# Altium PCB AmbientPro_Main_Board_V1.0.PcbDoc (part 5 of 5)
Units mm, origin at the board's own origin, x right, y up, seen from the top; angles counter-clockwise.
Board outline 100 x 100 mm, 4 copper layers (Top Layer, GND, PWR, Bottom Layer), stack 1.566 mm thick; 176 components, 124 nets, 570 pads, 283 vias.
Unrouted connection lines stored in the file: 133.
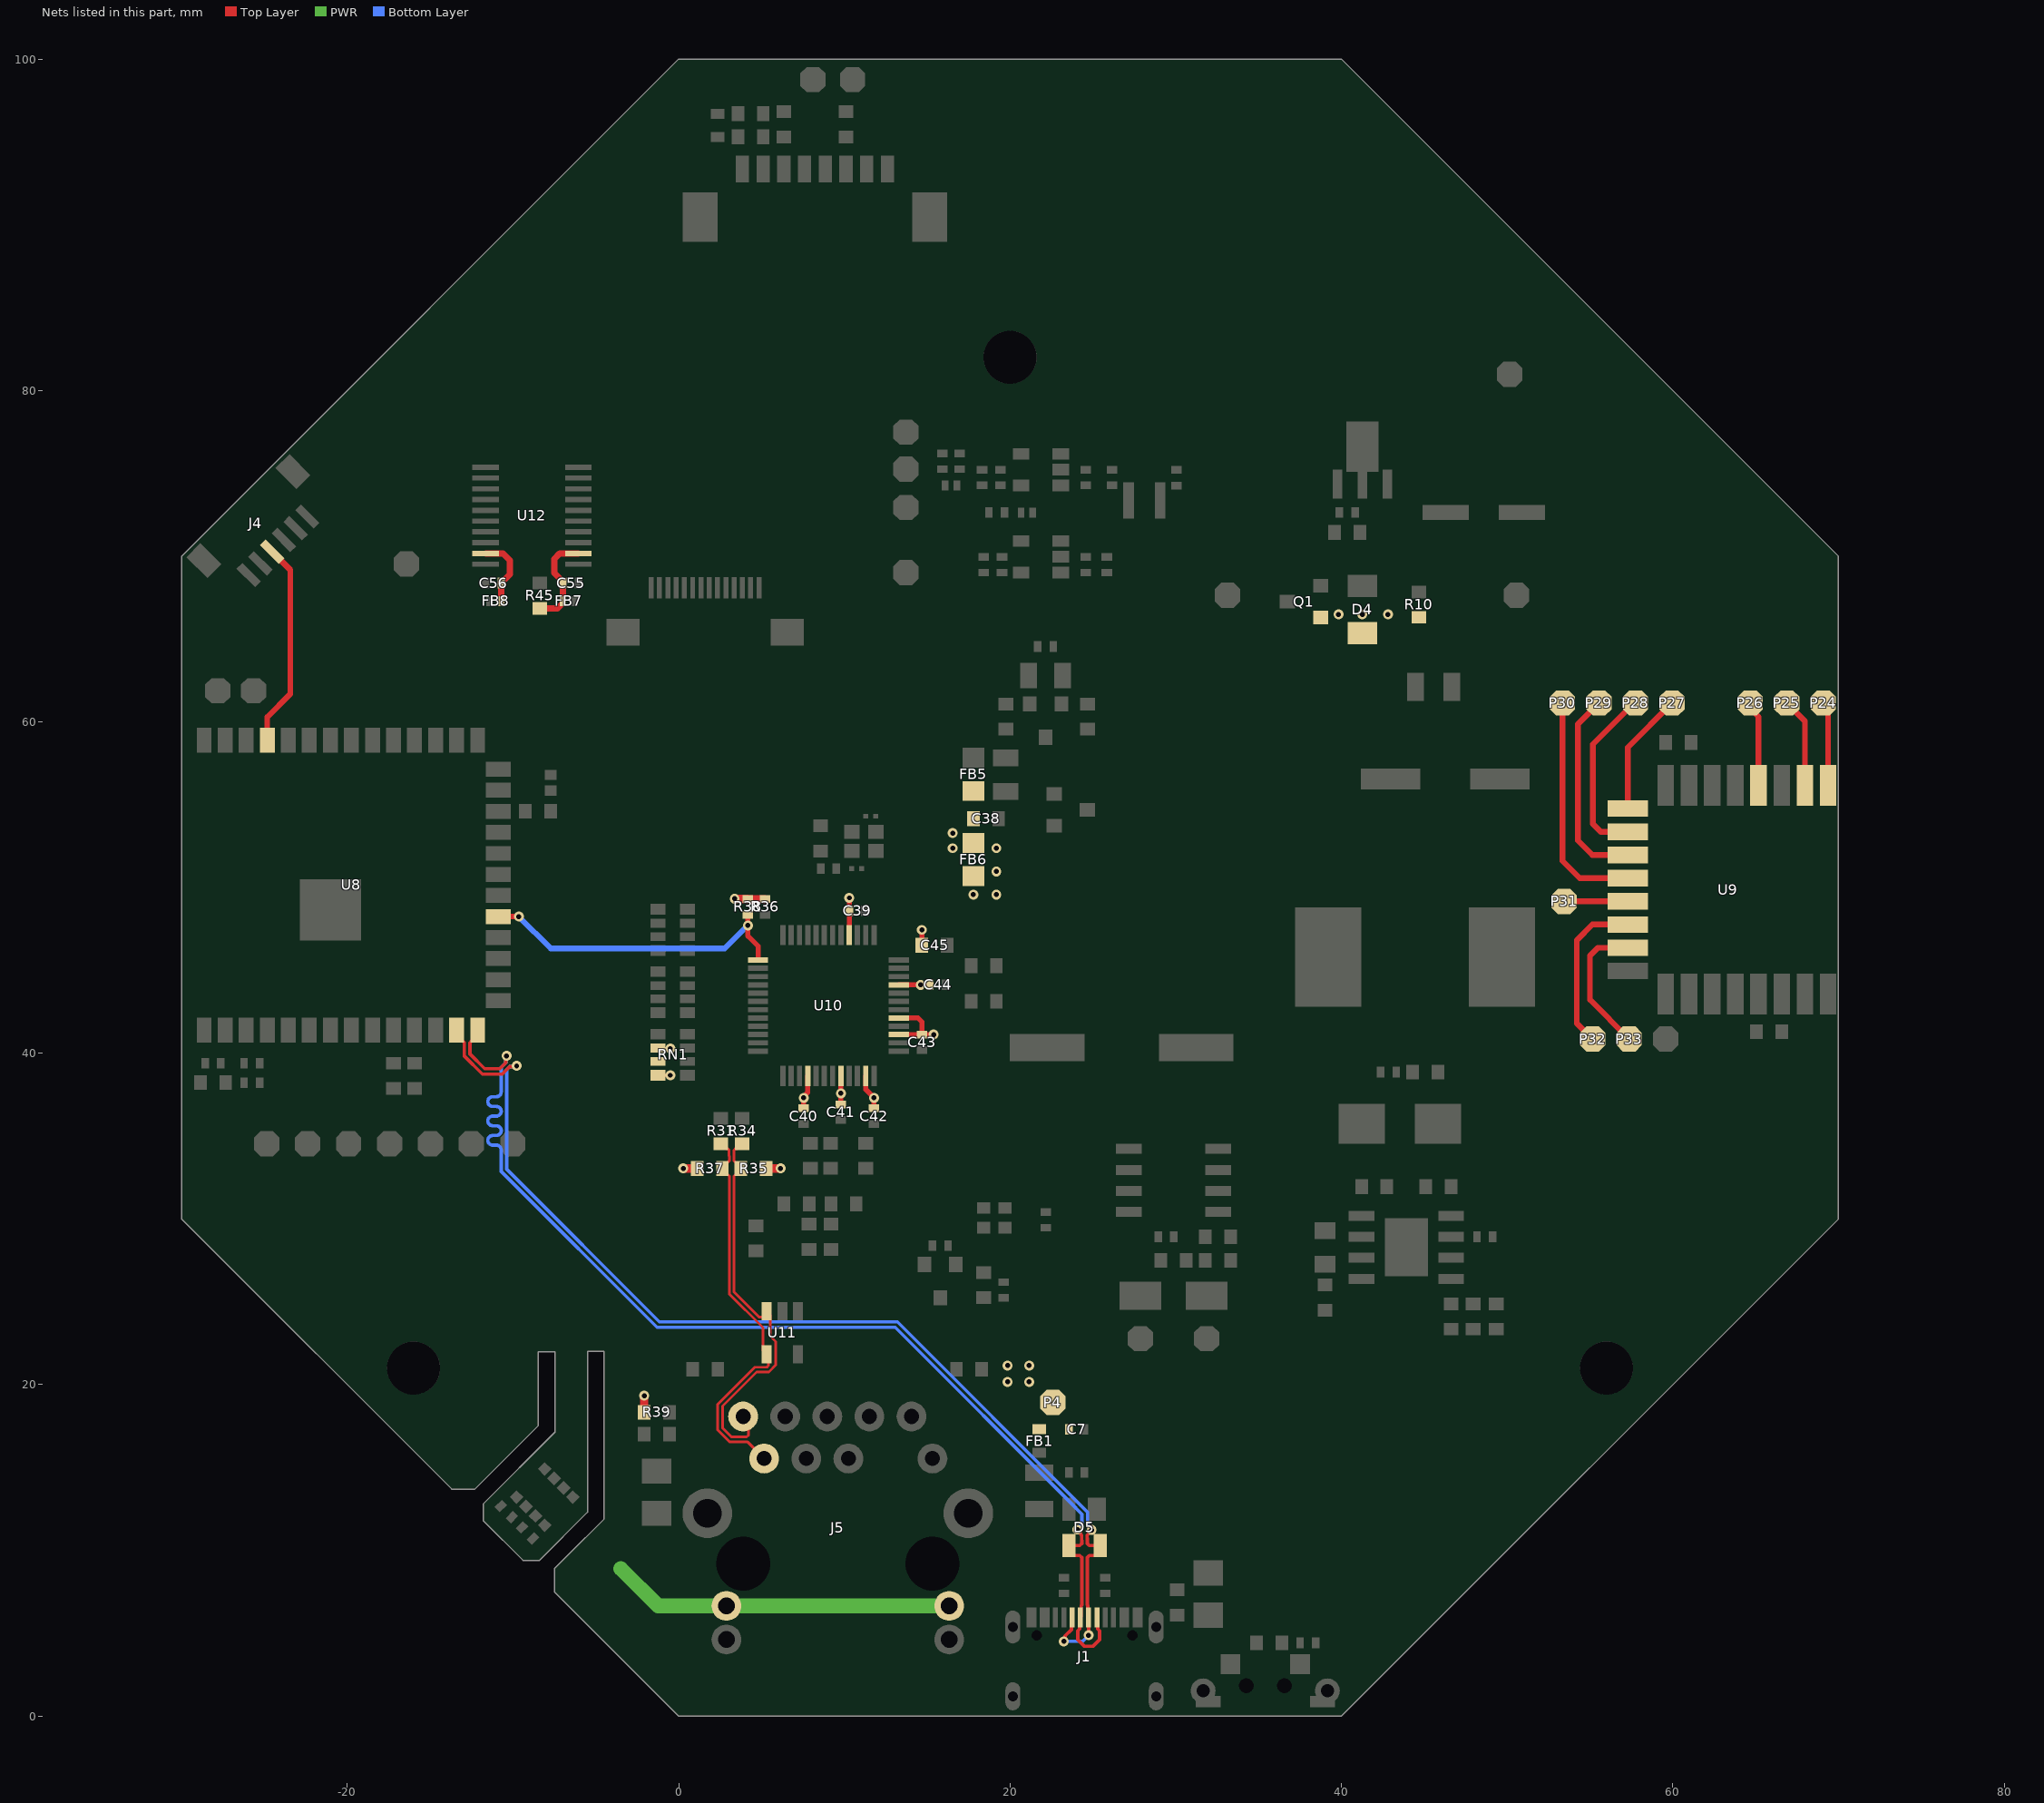
[diagram p5: the nets of this part, all layers, seen from the top]

## Via types
v1: diameter 0.6, hole 0.3, Top Layer to Bottom Layer, 283 vias

## Nets (pads, with @x,y where several pads share a name; then routed paths per layer and width w, separated by ;. In a path a pad name is that pad's centre, name@x,y a point inside that pad or via, vN(x,y) a via of type N, cw(c..) or ccw(c..) an arc to the next point about the centre after c; other vN are vias at no path point) (continued)
TD_N: J5.2 R31.1 R37.1 U11.4 | length 24.1
  Top Layer w0.16: R31.1@2.544,34.547 2.845,34.246 2.951,34.246 3.045,34.152 3.045,33.806 3.054,33.797 3.054,33.506 2.961,33.412 2.94,33.412 2.639,33.111 R37.1@2.639,33.048 2.639,32.984 2.94,32.683 2.961,32.683 3.054,32.59 3.054,25.479 5.084,23.449 5.084,22.064 5.416,21.732 5.416,21.148 5.322,21.054 4.589,21.054 2.361,18.826 2.361,17.261 3.063,16.559 4.141,16.559 J5.2@5.16,15.54
TD_P: J5.1 R34.1 R35.1 U11.3 | length 24.6
  Top Layer w0.16: R34.1@3.833,34.547 3.532,34.246 3.426,34.246 3.332,34.152 3.332,33.925 3.341,33.916 3.341,33.506 3.435,33.412 3.456,33.412 3.757,33.111 R35.1@3.757,33.048 3.757,32.984 3.456,32.683 3.435,32.683 3.341,32.59 3.341,25.597 4.857,24.082 5.084,24.082 5.304,24.302 U11.3@5.304,24.444 5.523,24.224 5.523,22.934 5.861,22.596 5.861,21.187 5.441,20.767 4.707,20.767 2.648,18.707 2.648,17.38 3.182,16.846 4.11,16.846 4.204,16.94 4.204,17.766 J5.1@3.89,18.08
TXD: J4.3 U8.37 | length 12.4
  Top Layer w0.345: U8.37@-24.834,58.901 -24.834,60.292 -23.441,61.685 -23.441,69.175 J4.3@-24.537,70.271
USB_D_N: D5.4 J1.A7 J1.B7 U8.13 | length 68.2
  Top Layer w0.203: U8.13@-13.404,41.401 -13.404,41.101 -13.055,40.753 -13.053,40.753 -12.934,40.634 -12.934,39.823 -11.846,38.735 -10.657,38.735 -10.201,39.191 -9.831,39.191 v1(-9.779,39.243) ; v1(23.246,4.509) 23.322,4.585 23.322,4.839 23.701,5.218 23.701,5.902 J1.B7@23.746,5.947 ; 24.661,8.231 24.661,6.713 24.698,6.677 24.698,5.996 J1.A7@24.746,5.947 v1(24.746,4.877) ; 24.662,8.231 24.662,9.573 24.781,9.692 25.148,9.692 25.447,9.99 D5.4@25.447,10.29 24.781,10.29 24.662,10.409 24.662,10.715 24.655,10.722 24.655,10.908 24.725,10.979 24.725,11.1 24.862,11.236 v1(24.924,11.236)
  Bottom Layer w0.203: v1(-9.779,39.243) -9.831,39.191 -10.201,39.191 -10.384,39.009 -10.384,34.061 -10.384,33.009 -1.167,23.792 13.2,23.792 24.672,12.32 24.672,11.575 24.924,11.323 v1(24.924,11.236) ; v1(23.246,4.509) 23.255,4.518 24.386,4.518 v1(24.746,4.877)
USB_D_P: D5.3 J1.A6 J1.B6 U8.14 | length 71
  Top Layer w0.203: U8.14@-12.134,41.401 -12.134,41.101 -12.482,40.753 -12.485,40.753 -12.604,40.634 -12.604,39.959 -11.709,39.065 -10.794,39.065 -10.435,39.425 -10.435,39.795 v1(-10.383,39.847) ; v1(24.07,11.25) 24.118,11.25 24.268,11.1 24.268,10.965 24.325,10.908 24.325,10.585 24.332,10.578 24.332,10.409 24.213,10.29 D5.3@23.547,10.29 23.547,9.99 23.845,9.692 24.213,9.692 24.332,9.573 24.332,8.368 ; 24.331,8.367 24.331,6.713 24.294,6.677 24.294,5.996 J1.A6@24.246,5.947 24.198,5.899 24.198,5.256 24.175,5.234 24.175,5.232 24.09,5.147 24.09,4.606 24.474,4.222 25.017,4.222 25.402,4.606 25.402,5.147 25.317,5.232 25.317,5.234 25.294,5.256 25.294,5.899 J1.B6@25.246,5.947
  Bottom Layer w0.203: v1(-10.383,39.847) -10.435,39.795 -10.435,39.425 -10.714,39.145 -10.714,38.513 -10.714,37.668 cw(c-11.006,37.668) -11.006,37.376 -11.227,37.376 ccw(c-11.227,37.084) -11.227,36.792 -11.006,36.792 cw(c-11.006,36.5) -11.006,36.208 -11.227,36.208 ccw(c-11.227,35.916) -11.227,35.624 -11.006,35.624 cw(c-11.006,35.331) -11.006,35.039 -11.227,35.039 ccw(c-11.227,34.747) -11.227,34.455 -11.006,34.455 cw(c-11.006,34.163) -10.714,34.163 -10.714,34.061 -10.714,32.872 -1.304,23.462 13.064,23.462 23.647,12.878 24.342,12.183 24.342,11.582 24.07,11.31 v1(24.07,11.25)
UWB_EXT: P24.1 U9.1 | length 5.1
  Top Layer w0.345: P24.1@69.088,61.138 69.377,60.848 U9.1@69.377,56.162
UWB_IO0: P33.1 U9.15 | length 8.5
  Top Layer w0.345: U9.15@57.282,46.367 55.47,46.367 55.004,45.902 55.004,43.224 P33.1@57.372,40.856
UWB_IO1: P32.1 U9.14 | length 9.8
  Top Layer w0.345: P32.1@55.167,40.856 54.209,41.814 54.209,46.818 55.158,47.767 U9.14@57.282,47.767
UWB_IO2: P31.1 U9.13 | length 3.8
  Top Layer w0.345: P31.1@53.447,49.167 U9.13@57.282,49.167
UWB_IO3: P30.1 U9.12 | length 13.9
  Top Layer w0.345: P30.1@53.343,61.138 53.343,51.617 54.393,50.567 U9.12@57.282,50.567
UWB_IO4: P29.1 U9.11 | length 12.2
  Top Layer w0.345: P29.1@55.548,61.138 54.273,59.863 54.273,52.836 55.142,51.967 U9.11@57.282,51.967
UWB_IO5: P28.1 U9.10 | length 10.7
  Top Layer w0.345: U9.10@57.282,53.367 55.659,53.367 55.184,53.842 55.184,58.651 57.671,61.138 P28.1@57.753,61.138
UWB_IO6: P27.1 U9.9 | length 7.5
  Top Layer w0.345: U9.9@57.282,54.767 57.282,58.462 P27.1@59.958,61.138
UWB_IO7: P26.1 U9.4 | length 5.2
  Top Layer w0.345: P26.1@64.677,61.138 64.953,60.862 64.953,60.529 65.177,60.305 U9.4@65.177,56.162
UWB_WAKE: P25.1 U9.2 | length 5.4
  Top Layer w0.345: P25.1@66.883,61.138 67.977,60.043 U9.2@67.977,56.162
VBUS: C7.2 D4.2 FB1.2 P4.1 Q1.1 R10.2
  other v1: 19.858,20.168 21.153,20.168 19.858,21.159 21.153,21.159 39.832,66.488 41.267,66.488 42.811,66.488
VCCA: C55.2 FB7.2 R45.2 U12.2 | length 6
  Top Layer w0.381: R45.2@-8.387,66.853 -7.322,66.853 -6.99,67.185 FB7.2@-6.99,67.285 C55.2@-6.99,68.377 -6.99,68.466 -7.517,68.993 -7.517,69.836 -7.19,70.164 U12.2@-6.05,70.164
VCCB: C56.2 FB8.2 U12.19 | length 4.3
  Top Layer w0.381: U12.19@-11.65,70.164 -10.599,70.164 -10.183,69.747 -10.183,68.904 C56.2@-10.71,68.377 FB8.2@-10.71,67.285
VDD: C38.2 C39.2 FB5.2 FB6.1 J5.11 J5.13 R36.1 R38.1 RN1.6 RN1.7 RN1.8 U10.28 | length 39.8
  Top Layer w0.16: RN1.8@-1.239,38.672 v1(-0.508,38.672) ; RN1.6@-1.239,40.312 -1.215,40.288 v1(-0.508,40.288)
  Top Layer w0.305: U10.28@10.29,47.128 10.296,47.134 10.296,48.582 C39.2@10.302,48.589 v1(10.302,49.378)
  Top Layer w0.508: v1(3.378,49.327) 3.392,49.313 4.166,49.313 R38.1@4.18,49.3 R36.1@5.204,49.3
  PWR w0.889: -3.489,8.9 -1.239,6.65 J5.11@2.88,6.65 J5.13@16.33,6.65
  Bottom Layer w0.762: J5.11@2.88,6.65 J5.13@16.33,6.65
  other v1: 16.535,52.375 19.174,52.375 16.535,53.289
VDDA: C40.2 C41.2 C42.2 C43.2 C44.2 C45.2 FB6.2 R35.2 R37.2 R39.2 U10.4 U10.8 U10.11 U10.15 U10.17 U10.21 | length 15.9
  Top Layer w0.305: C40.2@7.541,36.678 v1(7.541,37.315) 7.541,37.395 7.79,37.644 U10.4@7.79,38.628 ; C41.2@9.79,36.906 v1(9.79,37.58) U10.8@9.79,38.628 ; U10.11@11.29,38.628 11.29,37.815 v1(11.79,37.315) ; C42.2@11.79,36.678 v1(11.79,37.315) ; v1@11.79,37.391 v1(11.79,37.315) ; U10.15@13.29,41.128 C43.2@14.679,41.128 ; U10.17@13.29,42.128 14.45,42.128 14.679,41.899 C43.2@14.679,41.128 ; U10.21@13.29,44.128 v1(14.602,44.128) C44.2@15.161,44.128 ; C45.2@14.679,46.518 v1(14.679,47.447) ; v1(15.39,41.128) C43.2@14.679,41.128
  Top Layer w0.508: R39.2@-2.083,18.334 v1(-2.083,19.329) ; v1(0.279,33.048) R37.2@1.115,33.048 ; R35.2@5.281,33.048 v1(6.151,33.048)
  other v1: 17.789,49.581 19.174,49.581 19.174,50.966
W5500_RST: R38.2 U8.19 U10.37 | length 19.4
  Top Layer w0.305: R38.2@4.18,48.36 v1(4.18,47.719) 4.18,47.077 4.79,46.467 U10.37@4.79,45.649
  Top Layer w0.345: U8.19@-10.884,48.251 v1(-9.652,48.251)
  Bottom Layer w0.345: v1(-9.652,48.251) -7.72,46.32 2.781,46.32 v1(4.18,47.719)
pads on no net: J1.A8 J1.B8 J1.MH J2.MP1 J2.MP2 J3.7 J3.8 J3.S1 J3.S2 J4.MP1 J4.MP2 J5.MH LED1.2 RN1.4 RN1.5 RN2.1 RN2.2 RN2.7 RN2.8 SW1.3 SW1.4 SW1.5 SW1.6 SW1.MH0 SW1.MH1 U2.7 U4.4 U5.4 U8.15 U8.16 U8.26 U8.28 U8.29 U8.30 U10.7 U10.12 U10.13 U10.18 U10.24 U10.26 U10.46 U10.47

## Polygon pours and split planes (outlines as drawn)
+3V3 on PWR "+3V3_L03_P017" (solid, pour order 17): 35.789,26.248 35.789,15.977 33.731,13.919 19.38,13.919 19.38,0.479 39.747,0.479 63.017,23.749 38.288,23.749
VDD on PWR "VDD_L03_P000" (solid, pour order 0): 3.89,14.64 0.492,14.64 -0.102,14.046 -0.102,11.207 0.365,10.74 0.365,0.356 -7.087,7.807 -7.087,8.71 -3.937,11.859 -3.937,50.546 0.838,55.321 20.117,55.321 20.625,54.813 20.625,52.197 20.193,51.765 12.992,51.765 12.319,51.092 12.319,48.641 11.176,47.498 5.486,47.498 4.724,46.736 4.724,35.725 4.001,35.001 -0.864,35.001 -1.397,34.468 -1.397,32.69 -0.832,32.125 7.423,32.125 8.103,31.445 8.103,22.403 7.391,21.692 -2.083,21.692 -2.845,20.93 -2.845,18.694 -2.159,18.009 2.261,18.009 3.89,16.379
+3V3 on PWR "+3V3_L03_P013" (solid, pour order 13): 13.945,37.719 13.945,20.533 14.686,19.792 16.662,19.792 16.662,36.796 23.377,43.51 33.045,43.51 34.493,44.958 34.493,67.361 35.433,68.301 42.621,68.301 43.51,67.412 43.51,35.89 42.926,35.306 42.926,34.646 43.358,34.214 59.665,34.214 61.849,36.398 61.849,58.318 62.586,58.318 62.586,59.309 61.9,59.309 61.9,65.938 50.952,76.886 33.68,76.886 31.318,79.248 31.318,93.294 29.489,95.123 4.775,95.123 3.734,94.082 -1.295,94.082 -2.057,94.844 -2.057,97.333 -29.566,69.825 -29.566,30.277 -13.564,14.275 -12.421,14.275 -8.992,17.704 -8.992,22.53 -4.648,22.53 -4.648,50.521 0.584,55.753 20.295,55.753 21.006,55.042 21.006,44.78
VDDA on PWR "VDDA_L03_P011" (solid, pour order 11): 13.513,38.049 13.513,20.524 12.778,19.792 3.691,19.792 2.264,18.364 -2.057,18.364 -2.489,18.796 -2.489,20.828 -2.007,21.311 7.717,21.311 8.56,22.153 8.56,31.674 7.849,32.385 -0.711,32.385 -1.118,32.791 -1.118,34.341 -0.711,34.747 4.166,34.747 5.004,35.585 5.004,46.64 5.563,47.199 11.487,47.199 12.649,48.362 12.649,50.927 13.208,51.486 20.193,51.486 20.625,51.054 20.625,45.161
VBUS on PWR "VBUS_L03_P010" (solid, pour order 10): 23.825,43.18 17.043,36.398 17.043,19.787 21.58,19.787 23.063,21.27 23.063,26.321 22.76,26.625 21.305,26.625 19.964,27.965 19.964,33.985 21.158,35.179 42.189,35.179 43.205,36.195 43.205,67.335 42.52,68.021 35.535,68.021 34.849,67.335 34.849,44.729 33.299,43.18
+5V on PWR "+5V_L03_P009" (solid, pour order 9): 62.154,58.039 62.89,58.039 62.89,59.639 62.154,59.639 62.154,66.177 51.165,77.165 33.858,77.165 31.674,79.35 31.674,93.396 29.642,95.428 4.623,95.428 3.607,94.412 -1.143,94.412 -1.753,95.021 -1.753,97.638 0.178,99.568 39.726,99.568 69.494,69.799 69.494,30.201 63.424,24.13 38.71,24.13 35.687,27.153 21.351,27.153 20.269,28.234 20.269,33.706 21.412,34.849 42.193,34.849 43.181,33.86 59.87,33.86 62.154,36.144
LAN_PWR_N on PWR "LAN_PWR_N_L03_P007" (solid, pour order 7): 29.362,17.628 28.346,16.612 18.51,16.612 18.186,16.288 18.186,14.792 18.602,14.376 33.528,14.376 35.347,16.195 35.347,26.248 34.97,26.625 29.698,26.625 29.362,26.289
LAN_PWR_P on PWR "LAN_PWR_P_L03_P001" (solid, pour order 1): 23.425,21.216 21.742,19.533 18.492,19.533 18.186,19.227 18.186,17.348 18.491,17.043 28.016,17.043 28.88,17.907 28.88,26.279 28.534,26.625 23.729,26.625 23.425,26.321
+5V on Top Layer "+5V_L01_P005" (solid, pour order 5): 41.962,73.292 42.537,72.717 42.537,70.657 43.66,69.534 43.66,67.532 38.286,67.532 38.286,69.741 39.621,69.741 40.498,70.619 40.498,74.899 40.301,75.097 40.301,75.664 33.5,75.664 33.5,86.988 48.791,86.988 48.791,75.664 42.234,75.664 42.234,75.097 41.962,74.825
+3V3 on Top Layer "+3V3_L01_P006" (solid, pour order 6): 42.477,75.212 42.477,73.482 42.884,73.076 42.884,71.068 43.464,70.488 48.816,70.488 48.816,75.212
+5V on Top Layer "+5V_L01_P014" (solid, pour order 14): 28.733,74.483 28.733,72.248 35.735,72.248 35.735,86.988 33.5,86.988 33.5,75.482 33.5,74.483
NetC4_2 on Top Layer "NETC4_2_L01_P018" (solid, pour order 18): 51.692,62.953 46.076,62.953 46.076,50.216 46.076,42.796 51.692,42.796
GND on Top Layer "GND_L01_P016" (solid, remove dead copper, pour order 16): 69.453,32.36 54.634,32.36 54.634,15.366 39.815,0.546 0.089,0.546 -6.96,7.595 -6.96,8.661 -3.951,11.67 -3.951,22.567 -9.017,22.567 -9.017,17.805 -12.471,14.351 -13.614,14.351 -29.454,30.19 -29.454,69.81 0.19,99.453 39.815,99.453 54.938,84.331 54.938,67.386 69.453,67.386
+3V3 on Top Layer "+3V3_L01_P002" (solid, pour order 2): 52.629,23.749 52.629,37.42 53.233,38.024 54.085,38.024 54.634,37.475 54.634,22.518 38.849,6.732 38.557,6.732 36.125,6.74 35.42,6.036 35.42,4.893 35.42,3.975 34.499,3.975 34.499,8.54 37.42,8.54
LAN_PWR_P on Top Layer "LAN_PWR_P_L01_P004" (solid, pour order 4): 35.509,27.457 37.325,25.642 39.649,25.642 39.649,28.055 38.383,28.055 38.379,28.059 37.88,28.059 37.186,28.753 37.186,36.043 35.331,37.897 28.042,37.897 27.483,38.456 27.483,40.703 27.026,41.16 19.991,41.16 19.991,36.398 34.214,36.398 35.509,35.103
NetD5_2 on Top Layer "NETD5_2_L01_P003" (solid, pour order 3): 28.503,7.696 27.354,7.696 27.196,7.538 27.196,5.347 27.696,4.847 27.696,2.571 27.173,2.047 21.905,2.047 21.412,2.54 21.412,4.964 21.796,5.347 21.796,7.322 21.422,7.696 20.422,7.696 20.422,13.19 23.947,13.19 23.947,11.8 23.156,11.8 22.396,11.04 22.396,4.223 23.139,3.48 26.205,3.48 26.596,3.871 26.596,9.4 28.503,9.4
GND on Bottom Layer "GND_L04_P012" (solid, remove dead copper, pour order 12): -13.614,14.351 -12.471,14.351 -9.017,17.805 -9.017,22.567 -3.951,22.567 -3.951,11.67 -6.858,8.763 -6.858,7.493 0.089,0.546 39.815,0.546 69.453,30.185 69.453,69.739 39.739,99.453 0.19,99.453 -29.454,69.81 -29.454,30.19
NetR4_1 on Bottom Layer "NETR4_1_L04_P008" (solid, pour order 8): 32.703,31.42 32.703,27.026 36.932,27.026 36.932,23.601 47.142,23.601 47.142,30.074 45.796,31.42
GND on GND "GND_L02_P015" (solid, pour order 15): -13.614,14.351 -12.471,14.351 -9.017,17.805 -9.017,22.567 -3.951,22.567 -3.951,11.67 -6.858,8.763 -6.858,7.493 0.089,0.546 39.815,0.546 69.453,30.185 69.453,69.739 39.739,99.453 0.19,99.453 -29.454,69.81 -29.454,30.19

## Other copper
Top Layer:
  rectangle net +5V: 38.286,67.532 43.66,68.872
  rectangle net GND: 49.197,70.148 54.938,75.212
  rectangle net VBUS: 38.286,64.229 45.12,66.842
  rectangle net +5VP: 34.465,59.962 37.508,68.872
  rectangle net +3V3: -3.355,68.015 -1.505,68.742
  rectangle net +3V3: -1.87,67.442 -1.505,68.742
  rectangle net +5VP: 33.02,59.969 44.968,62.953
  rectangle net NetC1_1: 37.821,30.496 41.984,33.376
  rectangle net NetC1_1: 37.192,42.796 42.622,48.796
  rectangle net NetC1_1: 40.157,29.896 41.997,38.182
  rectangle net NetC1_1: 37.821,32.885 42.622,48.796
  rectangle net NetR4_1: 38.379,28.414 45.228,29.456
  rectangle net NetR4_1: 42.519,26.086 45.339,30.496
  rectangle net LAN_PWR_P: 38.379,26.59 39.649,27.779
  rectangle net LAN_PWR_P: 38.379,25.642 39.649,28.055
  rectangle net LAN_PWR_P: 38.379,27.246 42.088,28.059
  rectangle net NetR4_1: 38.379,28.523 39.649,29.815
  rectangle net NetC19_2: 21.488,73.635 27.483,74.62
  rectangle net VDD: -1.689,38.347 -0.305,40.577
  rectangle net GND: 67.477,42.347 69.877,44.797
  rectangle net VDD: 16.154,51.943 18.44,53.823
  rectangle net VDD: 16.154,51.943 19.812,53.238
  rectangle net VDDA: 16.154,49.022 19.812,51.296
  rectangle net VBUS: 19.202,16.986 22.005,21.768
  rectangle net NetC37_2: 17.129,57.227 22.555,59.935
  rectangle net +3V3: 19.3,60.618 21.904,64.865
  rectangle net NetC36_1: 22.386,60.618 25.117,64.865
  rectangle net VDD: 17.129,52.096 18.449,56.427
  region net +3V3: -8.022,11.029 -7.598,11.453 -8.649,12.505 -9.074,12.081
  region net +3V3: -9.349,13.219 -9.997,13.868 -10.576,13.29 -9.927,12.641
  region net +3V3: -11.618,12.248 -11.12,11.749 -9.499,13.37 -9.997,13.868
  region net +3V3: -9.697,10.326 -9.211,9.84 -7.598,11.453 -8.084,11.939
  region net GND: -9.05,11.446 -10.002,12.398 -10.862,11.538 -9.91,10.586
  region net GND: -10.394,11.892 -9.969,11.468 -8.791,12.646 -9.215,13.071
  rectangle net NetC24_2: 1.95,92.565 4.25,94.165
  rectangle net GND: 4.7,92.565 5.5,97.145
  rectangle net +5V: 1.95,96.116 3.957,97.289
  rectangle net NetC24_2: 1.95,92.565 3.957,95.86
  region net 1V8_SENSOR: 21.163,69.362 18.081,69.362 18.081,68.662 21.163,68.662
  rectangle net NetC13_2: 21.163,72.086 21.796,73.164
  rectangle net NetC13_2: 21.488,68.662 22.225,71.403
  rectangle net NetC13_2: 21.488,70.562 23.563,71.403
  rectangle net NetC13_2: 21.488,68.662 26.162,69.362
  rectangle net 3V3_CLEAN: 19.431,72.314 20.863,74.636
  rectangle net 3V3_SENSOR: 15.608,73.97 16.289,75.476
  rectangle net 3V3_CLEAN: 16.589,73.92 17.285,75.476
  rectangle net 3V3_CLEAN: 16.589,73.92 21.163,74.638
  rectangle net NetC19_2: 21.488,75.82 23.563,76.52
  rectangle net NetC19_2: 21.488,73.779 22.25,76.52
  rectangle net NetC19_2: 25.845,72.255 27.483,74.62
  rectangle net GND: 9.472,35.482 10.107,36.195
  rectangle net GND: 59.077,54.937 60.077,59.195
  rectangle net +3V3: 60.477,54.937 64.277,59.195
  region net LAN_PWR_N: 35.357,26.684 30.249,26.684 30.249,24.054 35.357,24.054
  rectangle net LAN_PWR_P: 23.52,29.368 25.552,41.16
  rectangle net NetR6_2: 32.842,28.473 33.764,30.722
  rectangle net NetR6_2: 31.793,29.939 33.764,30.722
  rectangle net LAN_PWR_N: 30.582,24.517 32.174,29.368
  rectangle net LAN_PWR_N: 30.249,24.486 32.174,27.945
  rectangle net LAN_PWR_P: 27.487,24.517 29.487,27.945
  rectangle net LAN_PWR_P: 23.52,29.368 29.17,30.722
  rectangle net LAN_PWR_P: 27.487,24.517 29.17,30.722
  rectangle net LAN_PWR_P: 23.419,24.054 29.487,26.684
  rectangle net VBUS: 19.202,16.986 23.775,19.688
  rectangle net NetC6_2: 20.422,14.19 22.614,16.204
  rectangle net NetC6_2: 20.422,14.19 23.775,15.19
  rectangle net GND: -1.689,42.123 -0.789,47.31
  rectangle net +3V3: -17.658,37.49 -15.499,38.252
  rectangle net GND: -29.247,37.782 -28.154,38.672
  region net GND: -28.154,42.151 -29.094,42.151 -29.094,37.782 -28.154,37.782
  rectangle net +3V3: -27.863,39.078 -26.002,39.713
  rectangle net +3V3: -27.864,37.782 -26.924,42.151
  rectangle net NetC54_2: -2.21,11.151 2.718,13.335
  rectangle net NetC11_1: 28.503,4.509 30.532,6.48
  rectangle net NetC11_1: 28.503,5.337 32.856,6.547
  pour cut-out: 49.767,41.438 51.859,41.438 51.867,41.446 51.867,42.607 49.767,42.607
  pour cut-out: 42.757,40.243 44.849,40.243 44.857,40.25 44.857,41.411 42.757,41.411
  pour cut-out: 42.342,49.047 44.434,49.047 44.442,49.055 44.442,50.216 42.342,50.216
  pour cut-out: 48.82,75.733 49.071,75.733 49.071,74.981 48.82,74.981
  pour cut-out: 29.487,23.795 30.249,23.795 30.249,24.054 29.487,24.054
  pour cut-out: 30.555,36.168 30.555,35.588 31.246,35.588 31.246,36.168 30.564,36.168
  pour cut-out: 0.365,14.478 18.847,14.478 18.847,0 0.365,0
GND:
  pour cut-out: 35.567,81.99 35.567,77.927 40.582,77.927 40.582,81.99
  pour cut-out: 0.365,14.478 18.847,14.478 18.847,0 0.365,0
  pour cut-out: 41.021,34.419 41.021,30.355 43.942,30.355 43.942,34.419
  pour cut-out: 39.116,43.256 39.116,37.846 43.815,37.846 43.815,43.256
  pour cut-out: 40,75.894 40,71.831 45.015,71.831 45.015,75.894
  pour cut-out: 19.355,21.717 19.355,19.634 21.742,19.634 21.742,21.717
PWR:
  pour cut-out: 39.548,54.585 39.548,55.613 44.348,55.613 44.348,54.585
  pour cut-out: 39.548,57.48 39.548,58.509 44.348,58.509 44.348,57.48
  pour cut-out: 44.854,33.884 48.232,33.884 48.232,37.219 44.85,37.219 44.85,38.222 49.248,38.222 49.248,32.766 44.859,32.766 44.854,32.771 44.854,33.879
  pour cut-out: 42.189,33.884 38.811,33.884 38.811,37.219 42.193,37.219 42.193,38.222 37.795,38.222 37.795,32.766 42.185,32.766 42.189,32.771 42.189,33.879
  pour cut-out: 0.365,14.478 18.847,14.478 18.847,0 0.365,0
  pour cut-out: 42.626,30.018 42.626,26.564 45.217,26.564 45.217,30.018
Bottom Layer:
  rectangle net VBUS: 38.286,64.229 44.676,68.202
  rectangle net +3V3: 42.873,70.122 48.816,75.228
  rectangle net VBUS: 19.431,19.863 21.59,21.59
  region net NetC1_1: 42.621,38.202 37.389,38.202 37.389,32.893 42.621,32.893
  rectangle net NetD5_2: 21.606,6.883 27.386,8.457
  region net NetD5_2: 28.672,9.347 26.487,9.347 26.487,7.722 28.672,7.722
  region net NetD5_2: 27.386,9.347 26.487,9.347 26.487,6.883 27.386,6.883
  rectangle net NetD5_2: 21.606,6.883 22.504,9.347
  rectangle net NetD5_2: 20.32,7.722 22.504,9.347
  pour cut-out: 23.385,24.326 23.385,26.459 25.798,26.459 25.798,24.326
  pour cut-out: 32.893,24.282 32.893,26.416 35.306,26.416 35.306,24.282
  pour cut-out: 15.088,34.9 26.06,45.872 66.015,45.872 67.361,44.526 67.361,39.802 65.684,39.802 65.684,43.18 26.721,43.18 14.97,31.429 14.97,34.784 15.087,34.901
  pour cut-out: 24.912,57.658 60.263,57.658 62.636,55.284 62.636,46.554 62.967,46.223 63.594,46.223 63.678,46.139 63.678,45.212 63.627,45.161 60.366,45.161 59.884,45.644 59.884,53.091 59.307,53.668 24.912,53.668
  pour cut-out: 29.504,61.369 -16.964,61.369 -23.952,54.381 -23.952,52.426 -19.935,52.426 -19.487,52.873 -19.487,53.157 -16.509,56.135 29.504,56.135
  pour cut-out: 38.717,81.025 38.717,76.962 43.732,76.962 43.732,81.025
  pour cut-out: -19.487,53.157 -19.487,43.162 -18.346,42.022 -13.843,42.022 -13.843,46.05 -16.275,46.05 -16.275,51.758 -15.033,53 -9.28,53 -8.862,53 -8.65,53 -8.65,55.535 -9.251,56.135 -16.509,56.135
  pour cut-out: -13.843,46.05 -13.843,42.022 -8.985,42.022 -8.23,41.267 -8.23,32.691 -4.293,28.753 14.97,28.753 14.97,34.56 -5.52,34.56 -5.52,43.237 -8.333,46.05
  pour cut-out: 20.307,62.343 20.307,64.816 19.367,64.816 19.367,62.343
  pour cut-out: 48.59,18.72 50.114,20.244 50.914,19.444 49.39,17.92
  pour cut-out: 54.013,35.001 54.013,37.363 53.073,37.363 53.073,35.001
  pour cut-out: 0.365,14.478 18.847,14.478 18.847,0 0.365,0

## Silkscreen, mask and mechanical layers (free items; w line width, h text height)
Top Overlay:
  drawing of 107 lines, arcs and shapes, not listed
  text "PMS_RX" at 0.38,98.53 h1.8
  text "PMS_TX" at 11.696,98.53 h1.8
  text "Rev-v1.0" at 24.517,88.305 h1.8
  text "+5V" at 51.192,80.406 h1.2
  text "GND" at 9.431,76.906 h1.2
  text "3V3_SENSOR" at 5.342,74.585 h1.2
  text "3V3_CLEAN" at 6.257,72.274 h1.2
  text "SPI3_CS_RDR" at -15.751,70.544 h1.2 r90
  text "1V8_SENSOR" at 5.39,68.337 h1.2
  text "+5VP" at 33.691,63.334 h1.2 r90
  text "+3V3" at 51.143,63.334 h1.2 r90
  text "SPI2_MISO" at -29.877,63.13 h1.2
  text "UWB_IO3" at 54.018,62.174 h1.2 r90
  text "UWB_IO4" at 56.224,62.174 h1.2 r90
  text "UWB_IO5" at 58.429,62.174 h1.2 r90
  text "UWB_IO6" at 60.634,62.174 h1.2 r90
  text "UWB_IO7" at 65.356,62.174 h1.2 r90
  text "UWB_WAKE" at 67.546,62.174 h1.2 r90
  text "UWB_EXIT" at 69.76,62.174 h1.2 r90
  text "SPI2_MOSI" at -24.624,61.199 h1.2
  text "UWB_IO2" at 54.117,41.882 h1.2 r90
  text "+" at 13.014,36.097 h2
  text "*" at 14.212,34.079 h2
  text "*" at 6.313,33.597 h2
  text "UWB_IO1" at 55.842,33.576 h1.2 r90
  text "UWB_IO0" at 58.048,33.576 h1.2 r90
  text "UWB_IO9" at 60.263,33.576 h1.2 r90
  text "+" at -5.858,31.03 h2
  text "SPI_SCK" at -24.192,28.667 h1.2 r90
  text "SPI_CS" at -21.721,28.667 h1.2 r90
  text "SCL" at -14.311,28.667 h1.2 r90
  text "SDA" at -11.822,28.667 h1.2 r90
  text "SPI3_SCK" at -9.333,28.07 h1.2 r90
  text "SPI3_MISO" at -19.264,26.822 h1.2 r90
  text "SPI3_MOSI" at -16.775,26.822 h1.2 r90
  text "POE-P" at 22.33,22.208 h1.2
  text "POE-N" at 32.899,22.2 h1.2
  text "VBUS" at 23.784,18.539 h1.2
Bottom Overlay:
  drawing of 14 lines, arcs and shapes, not listed
Top Solder:
  rectangle: 33.5,75.99 38.91,86.988
  rectangle: 33.5,80.663 48.791,86.988
  region: 48.791,86.988 43.584,86.988 43.584,76.015 48.791,76.015
Dimension:
  circle w0.013: c19.053,30.069 r2.5
Board Outline:
  lines w0.254: -30,30 -13.7,13.7 -12.3,13.7 -8.468,17.532 -8.468,18.188 -8.468,21.988 -7.468,21.988 -7.468,18.588 -7.468,17.132 -11.8,12.8 -11.8,11.8 -9.4,9.4 -8.4,9.4 -5.5,12.3 -5.5,15.9 -5.5,22 -4.5,22 -4.5,13 -4.5,12.1 -4.5,11.9 -6.7,9.7 -7.5,8.9 -7.5,7.5 -7.5,7.5 -7.5,7.5 0,0 40,0 70,30 70,70 40,100 0,100 -30,70 -30,30
Fabrication:
  drawing of 295 lines, arcs and shapes, not listed
  text "Layer" at 199.311,113.962 h1.52
  text "Name" at 209.723,113.962 h1.52
  text "Material" at 233.338,113.962 h1.52
  text "Thickness" at 255.176,113.962 h1.52
  text "Constant" at 271.682,113.962 h1.52
  text "Board Layer Stack" at 286.156,113.962 h1.52
  text "Top Overlay" at 209.723,110.914 h1.52
  text "Top Solder" at 209.723,107.866 h1.52
  text "Solder Resist" at 233.338,107.866 h1.52
  text "0.020mm" at 255.176,107.866 h1.52
  text "3.5" at 271.682,107.866 h1.52
  text "1" at 199.311,104.818 h1.52
  text "Top Layer" at 209.723,104.818 h1.52
  text "0.035mm" at 255.176,104.818 h1.52
  text "Dielectric 2" at 209.723,101.77 h1.52
  text "PP-006" at 233.338,101.77 h1.52
  text "0.203mm" at 255.176,101.77 h1.52
  text "4.4" at 271.682,101.77 h1.52
  text "2" at 199.311,98.722 h1.52
  text "GND" at 209.723,98.722 h1.52
  text "CF-004" at 233.338,98.722 h1.52
  text "0.030mm" at 255.176,98.722 h1.52
  text "Dielectric 1" at 209.723,95.674 h1.52
  text "FR-4" at 233.338,95.674 h1.52
  text "1.030mm" at 255.176,95.674 h1.52
  text "4.6" at 271.682,95.674 h1.52
  text "3" at 199.311,92.626 h1.52
  text "PWR" at 209.723,92.626 h1.52
  text "CF-004" at 233.338,92.626 h1.52
  text "0.030mm" at 255.176,92.626 h1.52
  text "Dielectric 3" at 209.723,89.578 h1.52
  text "PP-006" at 233.338,89.578 h1.52
  text "0.203mm" at 255.176,89.578 h1.52
  text "4.4" at 271.682,89.578 h1.52
  text "4" at 199.311,86.53 h1.52
  text "Bottom Layer" at 209.723,86.53 h1.52
  text "0.035mm" at 255.176,86.53 h1.52
  text "Bottom Solder" at 209.723,83.482 h1.52
  text "Solder Resist" at 233.338,83.482 h1.52
  text "0.020mm" at 255.176,83.482 h1.52
  text "3.5" at 271.682,83.482 h1.52
  text "Bottom Overlay" at 209.723,80.434 h1.52
  text "Total board thickness:" at 199.311,77.386 h1.52
  text "1.606mm" at 255.176,77.386 h1.52
Drill Drawing:
  circle w0.254: c-28.381,161.348 r0.847
  circle w0.254: c-28.381,127.058 r0.508
  circle w0.254: c-28.381,127.058 r0.847
  lines w0.254: -29.228,130.444 -28.805,130.444 -28.381,130.021 -27.958,130.444 -27.535,130.444 -27.958,130.868 -27.535,131.291 -27.958,131.291 -28.381,131.714 -28.805,131.291 -29.228,131.291 -28.805,130.868 -29.228,130.444 ; -29.228,134.254 -28.805,134.254 -28.805,133.831 -27.958,133.831 -27.958,134.254 -27.535,134.254 -27.535,135.101 -27.958,135.101 -27.958,135.524 -28.805,135.524 -28.805,135.101 -29.228,135.101 -29.228,134.254 ; -29.228,139.334 -27.535,139.334 -28.381,137.641 -29.228,139.334 ; -29.228,141.451 -29.228,141.874 -28.805,142.298 -29.228,142.721 -29.228,143.144 -28.805,143.144 -28.381,142.721 -27.958,143.144 -27.535,143.144 -27.535,142.721 -27.958,142.298 -27.535,141.874 -27.535,141.451 -27.958,141.451 -28.381,141.874 -28.805,141.451 -29.228,141.451 ; -29.228,145.261 -28.381,145.684 -27.535,145.261 -27.958,146.108 -27.535,146.954 -28.381,146.531 -29.228,146.954 -28.805,146.108 -29.228,145.261 ; -29.228,149.071 -27.535,149.071 -27.535,150.764 -29.228,150.764 -29.228,149.071 ; -29.228,153.304 -28.805,153.304 -28.381,152.881 -27.958,153.304 -27.535,153.304 -27.958,153.728 -27.535,154.151 -27.958,154.151 -28.381,154.574 -28.805,154.151 -29.228,154.151 -28.805,153.728 -29.228,153.304 ; -29.228,158.384 -27.535,158.384 -28.381,156.691 -29.228,158.384 ; -29.228,164.311 -27.535,164.311 -27.535,166.004 -29.228,166.004 -29.228,164.311 ; -28.889,138.996 -27.873,138.996 -28.381,137.98 -28.889,138.996 ; -28.889,149.41 -27.873,149.41 -27.873,150.426 -28.889,150.426 -28.889,149.41 ; -28.889,153.474 -28.635,153.474 -28.381,153.22 -28.127,153.474 -27.873,153.474 -28.127,153.728 -27.873,153.982 -28.127,153.982 -28.381,154.236 -28.635,153.982 -28.889,153.982 -28.635,153.728 -28.889,153.474
  lines w0.381: -30.747,125.068 312.615,125.068 ; -30.747,166.978 312.615,166.978 ; -16.754,121.258 -16.754,170.788 ; -1.772,121.258 -1.772,170.788 ; 27.429,121.258 27.429,170.788 ; 40.278,121.258 40.278,170.788 ; 58.917,121.258 58.917,170.788 ; 97.005,121.258 97.005,170.788 ; 111.988,121.258 111.988,170.788 ; 130.931,121.258 130.931,170.788 ; 159.878,121.258 159.878,170.788 ; 181.564,121.258 181.564,170.788 ; 215.438,121.258 215.438,170.788 ; 249.311,121.258 249.311,170.788 ; 276.989,121.258 276.989,170.788 ; -30.747,121.258 312.615,121.258 312.615,170.788 -30.747,170.788 -30.747,121.258
  text "Symbol" at -28.461,168.121 h1.83
  text "Count" at -15.611,168.121 h1.83
  text "Hole Size" at -0.629,168.121 h1.83
  text "Plated" at 28.572,168.121 h1.83
  text "Hole Type" at 41.421,168.121 h1.83
  text "Drill Layer Pair" at 60.06,168.121 h1.83
  text "Via/Pad" at 98.148,168.121 h1.83
  text "Pad Shape" at 113.131,168.121 h1.83
  text "Template" at 132.074,168.121 h1.83
  text "Description" at 161.021,168.121 h1.83
  text "Hole Tolerance (+)" at 182.707,168.121 h1.83
  text "Hole Tolerance (-)" at 216.581,168.121 h1.83
  text "Hole Length" at 250.454,168.121 h1.83
  text "Routed Path Length" at 278.132,168.121 h1.83
  text "2" at -15.611,164.311 h1.52
  text "0.600mm (23.62mil)" at -0.629,164.311 h1.52
  text "PTH" at 28.572,164.311 h1.52
  text "Slot" at 41.421,164.311 h1.52
  text "Top Layer - Bottom Layer" at 60.06,164.311 h1.52
  text "Pad" at 98.148,164.311 h1.52
  text "Rounded" at 113.131,164.311 h1.52
  text "r90_170h60_140r100" at 132.074,164.311 h1.52
  text "1.400mm (55.12mil)" at 250.454,164.311 h1.52
  text "0.800mm (31.50mil)" at 278.132,164.311 h1.52
  text "2" at -15.611,160.501 h1.52
  text "0.600mm (23.62mil)" at -0.629,160.501 h1.52
  text "PTH" at 28.572,160.501 h1.52
  text "Slot" at 41.421,160.501 h1.52
  text "Top Layer - Bottom Layer" at 60.06,160.501 h1.52
  text "Pad" at 98.148,160.501 h1.52
  text "Rounded" at 113.131,160.501 h1.52
  text "(Mixed)" at 132.074,160.501 h1.52
  text "1.700mm (66.93mil)" at 250.454,160.501 h1.52
  text "1.100mm (43.31mil)" at 278.132,160.501 h1.52
  text "2" at -15.611,156.691 h1.52
  text "0.620mm (24.41mil)" at -0.629,156.691 h1.52
  text "NPTH" at 28.572,156.691 h1.52
  text "Round" at 41.421,156.691 h1.52
  text "Top Layer - Bottom Layer" at 60.06,156.691 h1.52
  text "Pad" at 98.148,156.691 h1.52
  text "Rounded" at 113.131,156.691 h1.52
  text "c0hn62" at 132.074,156.691 h1.52
  text "-" at 250.454,156.691 h1.52
  text "-" at 278.132,156.691 h1.52
  text "2" at -15.611,152.881 h1.52
  text "0.800mm (31.50mil)" at -0.629,152.881 h1.52
  text "PTH" at 28.572,152.881 h1.52
  text "Round" at 41.421,152.881 h1.52
  text "Top Layer - Bottom Layer" at 60.06,152.881 h1.52
  text "Pad" at 98.148,152.881 h1.52
  text "Rounded" at 113.131,152.881 h1.52
  text "c150h80" at 132.074,152.881 h1.52
  text "-" at 250.454,152.881 h1.52
  text "-" at 278.132,152.881 h1.52
  text "2" at -15.611,149.071 h1.52
  text "0.900mm (35.43mil)" at -0.629,149.071 h1.52
  text "NPTH" at 28.572,149.071 h1.52
  text "Round" at 41.421,149.071 h1.52
  text "Top Layer - Bottom Layer" at 60.06,149.071 h1.52
  text "Pad" at 98.148,149.071 h1.52
  text "Rounded" at 113.131,149.071 h1.52
  text "c0hn90" at 132.074,149.071 h1.52
  text "-" at 250.454,149.071 h1.52
  text "-" at 278.132,149.071 h1.52
  text "2" at -15.611,145.261 h1.52
  text "1.720mm (67.72mil)" at -0.629,145.261 h1.52
  text "PTH" at 28.572,145.261 h1.52
  text "Round" at 41.421,145.261 h1.52
  text "Top Layer - Bottom Layer" at 60.06,145.261 h1.52
  text "Pad" at 98.148,145.261 h1.52
  text "Rounded" at 113.131,145.261 h1.52
  text "c300h172" at 132.074,145.261 h1.52
  text "-" at 250.454,145.261 h1.52
  text "-" at 278.132,145.261 h1.52
  text "2" at -15.611,141.451 h1.52
  text "3.250mm (127.95mil)" at -0.629,141.451 h1.52
  text "NPTH" at 28.572,141.451 h1.52
  text "Round" at 41.421,141.451 h1.52
  text "Top Layer - Bottom Layer" at 60.06,141.451 h1.52
  text "Pad" at 98.148,141.451 h1.52
  text "Rounded" at 113.131,141.451 h1.52
  text "c0hn325" at 132.074,141.451 h1.52
  text "-" at 250.454,141.451 h1.52
  text "-" at 278.132,141.451 h1.52
  text "3" at -15.611,137.641 h1.52
  text "3.200mm (125.98mil)" at -0.629,137.641 h1.52
  text "NPTH" at 28.572,137.641 h1.52
  text "Round" at 41.421,137.641 h1.52
  text "Top Layer - Bottom Layer" at 60.06,137.641 h1.52
  text "Pad" at 98.148,137.641 h1.52
  text "Rounded" at 113.131,137.641 h1.52
  text "c320hn320" at 132.074,137.641 h1.52
  text "-" at 250.454,137.641 h1.52
  text "-" at 278.132,137.641 h1.52
  text "4" at -15.611,133.831 h1.52
  text "1.020mm (40.16mil)" at -0.629,133.831 h1.52
  text "PTH" at 28.572,133.831 h1.52
  text "Round" at 41.421,133.831 h1.52
  text "Top Layer - Bottom Layer" at 60.06,133.831 h1.52
  text "Pad" at 98.148,133.831 h1.52
  text "Rounded" at 113.131,133.831 h1.52
  text "c180h102" at 132.074,133.831 h1.52
  text "-" at 250.454,133.831 h1.52
  text "-" at 278.132,133.831 h1.52
  text "9" at -15.611,130.021 h1.52
  text "0.910mm (35.83mil)" at -0.629,130.021 h1.52
  text "PTH" at 28.572,130.021 h1.52
  text "Round" at 41.421,130.021 h1.52
  text "Top Layer - Bottom Layer" at 60.06,130.021 h1.52
  text "Pad" at 98.148,130.021 h1.52
  text "Rounded" at 113.131,130.021 h1.52
  text "c180h91" at 132.074,130.021 h1.52
  text "-" at 250.454,130.021 h1.52
  text "-" at 278.132,130.021 h1.52
  text "283" at -15.611,126.211 h1.52
  text "0.300mm (11.81mil)" at -0.629,126.211 h1.52
  text "PTH" at 28.572,126.211 h1.52
  text "Round" at 41.421,126.211 h1.52
  text "Top Layer - Bottom Layer" at 60.06,126.211 h1.52
  text "Via" at 98.148,126.211 h1.52
  text "Rounded" at 113.131,126.211 h1.52
  text "v60h30" at 132.074,126.211 h1.52
  text "-" at 250.454,126.211 h1.52
  text "-" at 278.132,126.211 h1.52
  text "313 Total" at -15.611,122.401 h1.52
  text "Slot definitions :" at -28.461,118.719 h1.52
  text "Routed Path Length" at -2.23,118.719 h1.52
  text "= Calculated from tool start centre position to tool end centre position." at 25.777,118.719 h1.52
  text "Hole Length" at -2.23,116.179 h1.52
  text "= Routed Path Length + Tool Size = Slot length as defined in the PCB layout" at 15.367,116.179 h1.52

## Text inside footprints (layer, text, board x,y; h text height)
J1: Mechanical 13 "PCB Edge" at 23.158,0.574 h0.8
J2: Top Overlay "1" at -1.793,66.32 h0.76; Top Overlay "PCB Edge" at 0.343,63.501 h0.8
J3: Top Overlay "PCB Edge" at 6.85,88.664 h0.8
J5: Top Overlay "PCB Edge" at 8.411,-1.022 h1.52
U9: Top Overlay "NON-Ground" at 74.762,54.435 h1 r270